# Altium PCB IOT_Speaker.PcbDoc (part 4 of 4)
Units mm, origin at the board's own origin, x right, y up, seen from the top; angles counter-clockwise.
Board outline 89.7 x 68.14 mm, 2 copper layers (Top Layer, Bottom Layer), stack 1.448 mm thick; 210 components, 131 nets, 623 pads, 336 vias.
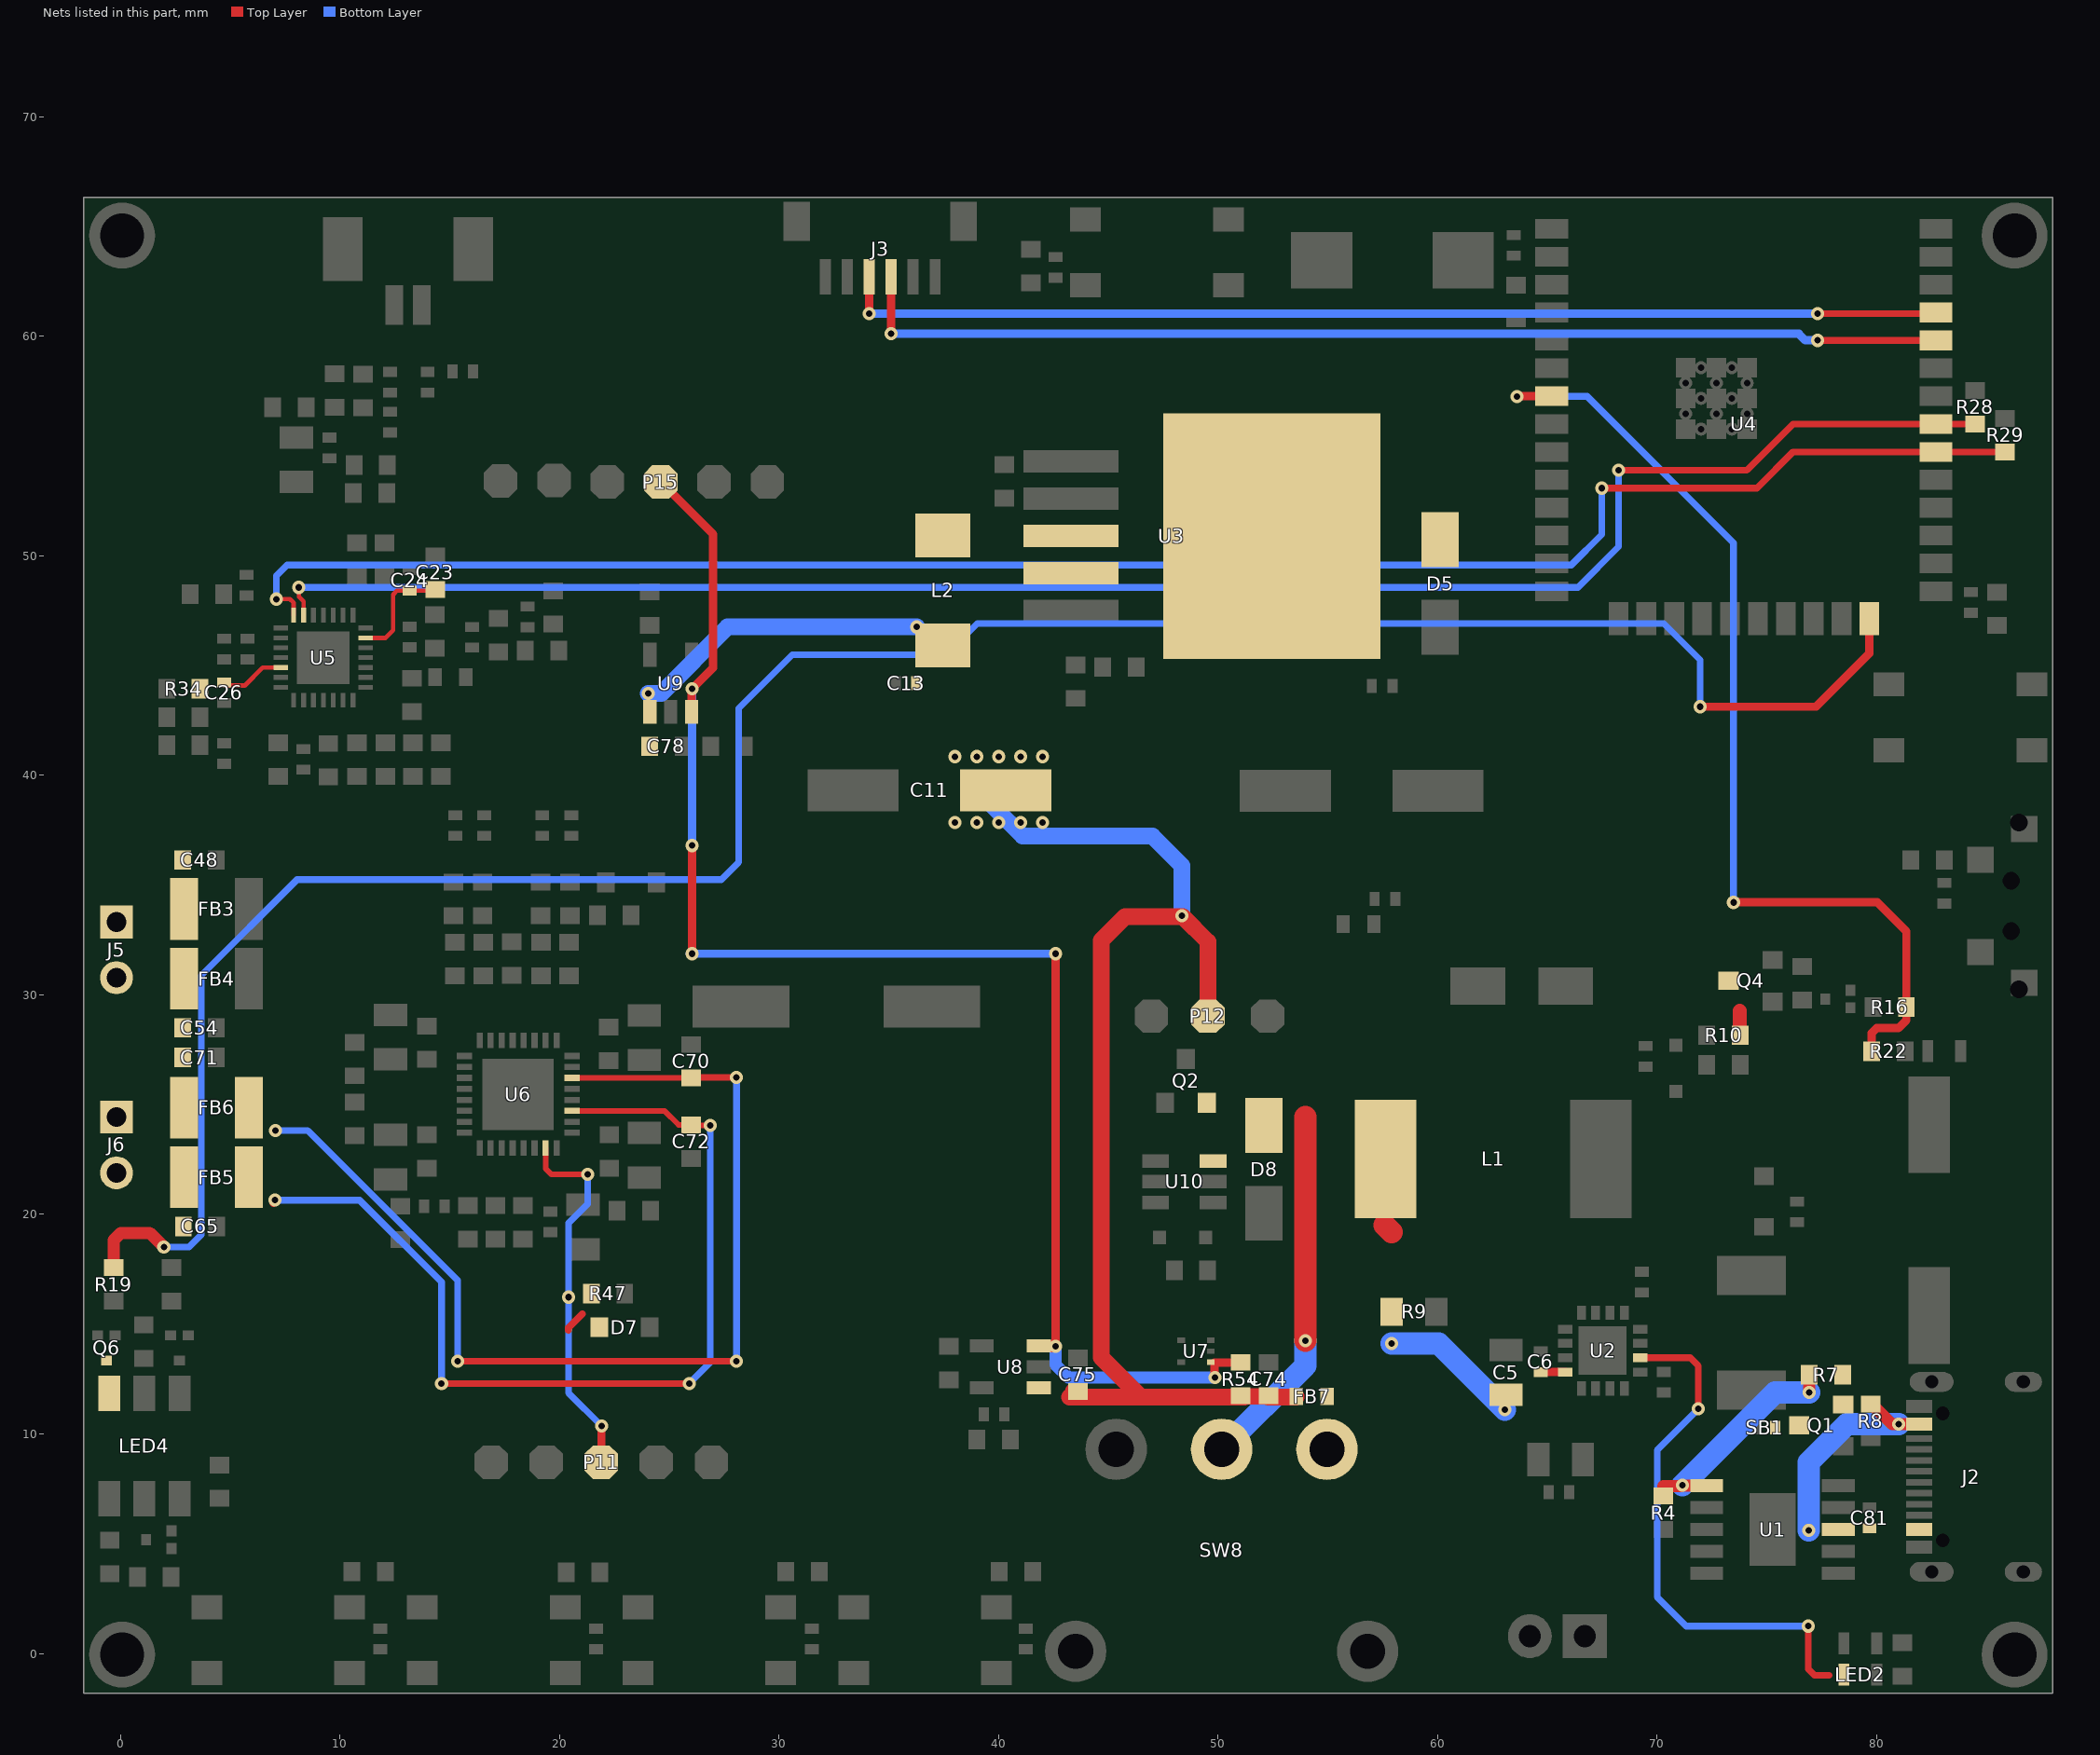
[diagram p3: the nets of this part, all layers, seen from the top]

## Via types
v1: diameter 0.6, hole 0.3, Top Layer to Bottom Layer, 183 vias
v2: diameter 0.6, hole 0.3, Top Layer to Bottom Layer, tented both sides, 153 vias

## Nets (pads, with @x,y where several pads share a name; then routed paths per layer and width w, separated by ;. In a path a pad name is that pad's centre, name@x,y a point inside that pad or via, vN(x,y) a via of type N, cw(c..) or ccw(c..) an arc to the next point about the centre after c; other vN are vias at no path point) (continued)
PWR_EN: P15.1 R54.1 U7.1 U8.3 U9.3 | length 70.2
  Top Layer w0.381: P15.1@24.498,53.48 27,50.978 27,44.907 v2(26.035,43.942) 26.027,43.934 26.027,42.904 U9.3@26.02,42.896 ; v2@25.976,31.877 v2@26.035,31.936 ; v2(26.035,31.877) v2@26.035,31.936 ; v2(26.035,36.805) v2@26.035,31.936 ; U8.3@41.838,14.006 41.844,14.001 42.091,14.001 42.591,14.001 v2(42.596,13.995) ; v2@42.596,14.192 v2(42.596,31.877) ; v2(49.86,12.573) 49.849,12.584 49.849,13.241 51.198,13.241 R54.1@51.206,13.233
  Top Layer w0.559: U8.3@42.071,14.021 42.091,14.001 42.096,13.995 v2(42.596,13.995)
  Bottom Layer w0.381: v2@25.933,31.877 v2(26.035,31.877) v2(42.596,31.877) ; v2(26.035,36.805) v2(26.035,43.942)
  Bottom Layer w0.559: v2(42.596,13.995) 42.596,13.157 43.18,12.573 v2(49.86,12.573)
R_EN: R19.2 U4.24 | length 109.8
  Top Layer w0.381: v2(71.958,43.129) 77.241,43.129 79.672,45.56 U4.24@79.672,47.137
  Top Layer w0.559: R19.2@-0.305,17.577 -0.305,18.824 0.023,19.152 1.335,19.152 1.97,18.517 v2(1.981,18.517)
  Bottom Layer w0.305: v2(1.981,18.517) 3.124,18.517 3.683,19.075 3.683,30.886 8.052,35.255 27.381,35.255 28.169,36.043 28.169,43.053 30.607,45.491 37.617,45.491 39.039,46.914 70.307,46.914 71.958,45.263 v2(71.958,43.129)
RED: LED4.6 Q6.3 | length 0.2
  Top Layer w0.635: LED4.6@-0.635,11.976 LED4.6@-0.508,11.849
ROUTN: C70.1 FB6.1 U6.30 | length 48
  Top Layer w0.254: U6.30@20.569,26.219 20.572,26.216 26.01,26.216 C70.1@26.032,26.238
  Top Layer w0.305: v2(15.367,13.31) v2(28.067,13.31) ; C70.1@26.032,26.238 v2(28.067,26.238)
  Bottom Layer w0.305: v2(7.061,23.825) 8.534,23.825 15.367,16.993 v2(15.367,13.31) ; v2(28.067,13.31) v2(28.067,26.238)
ROUTP: C72.1 FB5.1 U6.27 | length 44
  Top Layer w0.254: U6.27@20.569,24.719 24.786,24.719 25.425,24.079 C72.1@25.753,24.079 ; C72.1@25.692,24.172 25.753,24.111 C72.1@25.753,24.079 ; v2(26.873,24.054) 26.035,24.054 C72.1@26.01,24.079 C72.1@25.753,24.079
  Top Layer w0.305: v2(14.63,12.294) v2(25.908,12.294)
  Top Layer w0.381: v2@6.985,20.523 6.985,20.599 v2(7.036,20.65)
  Bottom Layer w0.305: v2(7.036,20.65) 10.897,20.65 14.63,16.916 v2(14.63,12.294) ; v2(25.908,12.294) 26.873,13.259 v2(26.873,24.054)
RXD: J3.4 U4.34 | length 50.3
  Top Layer w0.305: v2(77.318,59.817) U4.34@82.702,59.817
  Top Layer w0.381: v2(35.103,60.122) 35.106,60.125 35.106,62.709 J3.4@35.109,62.713
  Bottom Layer w0.381: v2(35.103,60.122) 76.454,60.122 76.759,59.817 v2(77.318,59.817)
S\D\: D7.1 P11.1 R47.2 U6.23 | length 18.1
  Top Layer w0.254: U6.23@19.369,23.019 19.369,22.084 19.634,21.819 v2(21.285,21.819)
  Top Layer w0.305: 20.422,14.707 20.405,14.724 20.405,14.829 21.044,15.469
  Top Layer w0.381: P11.1@21.907,8.712 21.914,8.719 21.914,10.357 v2(21.92,10.363)
  Bottom Layer w0.305: v2(21.285,21.819) 21.285,20.472 20.422,19.609 v2(20.422,16.231) 20.422,11.862 v2(21.92,10.363)
SCL: R29.1 U4.30 U5.28 | length 84.8
  Top Layer w0.203: v2(7.112,48.031) 7.722,48.031 7.896,47.857 U5.28@7.896,47.297
  Top Layer w0.305: v2(67.488,53.086) 74.549,53.086 76.2,54.737 U4.30@82.702,54.737 R29.1@85.852,54.737
  Bottom Layer w0.305: v2(7.112,48.031) 7.112,49.1 7.593,49.581 66.091,49.581 67.488,50.978 v2(67.488,53.086)
SDA: R28.1 U4.31 U5.27 | length 82.8
  Top Layer w0.203: v2@8.136,48.556 8.136,48.13 8.346,47.921 U5.27@8.346,47.297
  Top Layer w0.305: v2(68.25,53.899) 74.092,53.899 76.2,56.007 U4.31@82.702,56.007 R28.1@84.48,56.007
  Bottom Layer w0.305: v2(8.128,48.565) 66.396,48.565 68.25,50.419 v2(68.25,53.899)
SLK: C26.1 R34.1 U5.5 | length 2.9
  Top Layer w0.203: C26.1@4.724,44.094 5.664,44.094 6.484,44.914 U5.5@7.313,44.914
SPKL_N: C48.2 FB3.2 J5.1
SPKL_P: C54.2 FB4.2 J5.2
SPKR_N: C71.2 FB6.2 J6.1
SPKR_P: C65.2 FB5.2 J6.2
STDBY: LED2.2 U2.14 | length 24.6
  Top Layer w0.305: U2.14@69.239,13.471 71.517,13.471 71.882,13.106 v2(71.882,11.141) ; v2(76.886,1.245) 76.886,-0.711 77.165,-0.991 77.835,-0.991 ; LED2.2@78.473,-0.991 LED2.2@78.508,-0.956
  Bottom Layer w0.305: v2(71.882,11.141) 70.002,9.261 70.002,2.565 71.323,1.245 v2(76.886,1.245)
SW_BOOST: D5.2 L2.2 U3.3 U3.6
TXD: J3.3 U4.35 | length 50.3
  Top Layer w0.305: v2(77.318,61.041) U4.35@82.656,61.041
  Top Layer w0.381: J3.3@34.109,62.713 34.109,61.09 34.112,61.087 v2(34.112,61.041) ; U4.35@82.656,61.041 U4.35@82.702,61.087
  Bottom Layer w0.381: v2(34.112,61.041) v2(77.318,61.041)
V_MON: Q4.3 R10.2 | length 1.2
  Top Layer w0.508: Q4.3@73.26,30.643 Q4.3@73.31,30.593
  Top Layer w0.635: R10.2@73.767,28.163 73.767,29.269
V_SYS: D8.1 Q2.2 SW8.2 U10.6 | length 16.7
  Top Layer w1.016: v1(53.975,14.249) 53.975,24.435
  Bottom Layer w1.016: SW8.2@50.165,9.299 53.975,13.109 v1(53.975,14.249)
V_SYS#: FB7.2 SW8.1 | length 0
V_SYS##: C11.1 C13.1 C74.1 C75.1 C78.1 FB7.1 L2.1 P12.1 R54.2 U3.4 U8.1 U9.1 | length 67.4
  Top Layer w0.762: C75.1@43.231,11.684 46.482,11.684 ; C75.1@43.409,11.938 43.472,11.938 C75.1@43.701,11.709 ; P12.1@49.536,29.032 49.536,32.429 48.4,33.566 45.758,33.566 44.679,32.487 44.679,13.487 46.482,11.684 ; R54.2@51.206,11.684 46.482,11.684 ; R54.2@51.206,11.709 C74.1@52.476,11.709 ; C74.1@52.273,11.684 53.566,11.684 FB7.1@53.566,11.709
  Bottom Layer w0.762: v1(24.054,43.739) 24.638,43.739 27.661,46.761 v1(36.271,46.761) ; 39.611,38.735 40.251,38.095 40.751,37.595 41.103,37.243 47.009,37.243 48.362,35.89 v1(48.362,33.604)
  other v1: 38.012,37.855 39.012,37.855 40.012,37.855 41.012,37.855 42.012,37.855 38.012,40.855 39.012,40.855 40.012,40.855 41.012,40.855 42.012,40.855
VBUS: C81.1 J2.A4/B9 J2.B4/A9 Q1.2 R7.2 R8.2 U1.8 | length 10.5
  Top Layer w0.559: v1(76.911,5.613) v1@76.915,5.617 ; R8.2@79.731,11.354 79.794,11.354 80.702,10.446 v1(81.001,10.446) J2.B4/A9@81.937,10.446
  Bottom Layer w1.016: v1(76.911,5.613) 76.911,8.712 78.645,10.446 v1(81.001,10.446)
VDD_CH: R4.2 R7.1 U1.1 | length 10.3
  Top Layer w0.559: 70.282,7.62 71.101,7.62 71.141,7.66 71.163,7.66 71.183,7.641 72.231,7.641 U1.1@72.235,7.638 ; v1@76.933,11.891 R7.1@76.933,12.686
  Bottom Layer w1.016: v1(71.152,7.66) 75.379,11.887 v1(76.937,11.887)
VMID: C23.1 C24.1 U5.20 | length 5
  Top Layer w0.203: U5.20@11.179,46.264 12.076,46.264 12.421,46.609 12.421,48.235 12.598,48.412 14.275,48.412 C23.1@14.338,48.476
VOUT_CH: Q1.3 SB1.1
VS: C5.1 C6.1 L1.2 R9.1 U2.8 | length 8.5
  Top Layer w0.381: C6.1@64.599,12.821 U2.8@65.822,12.821
  Top Layer w0.635: L1.2@57.637,22.53 L1.2@57.912,22.255
  Top Layer w1.016: 57.594,19.507 57.912,19.19
  Bottom Layer w1.016: v1(57.912,14.122) 60.057,14.122 v1(63.073,11.106)
WIFI_BAT_STAT: R16.2 R22.2 U4.7 | length 45.9
  Top Layer w0.381: v2@63.628,57.277 U4.7@65.202,57.277 ; v2(73.482,34.214) 80.035,34.214 81.356,32.893 R16.2@81.356,29.439 ; R22.2@79.781,27.432 79.781,28.262 80.005,28.485 80.992,28.485 81.356,28.849 R16.2@81.356,29.439 ; R16.2@81.215,29.297 R16.2@81.356,29.439
  Bottom Layer w0.305: v2(63.615,57.264) 66.815,57.264 73.482,50.597 v2(73.482,34.214)
pads on no net: J2.A8 J2.B8 J2.MH SW3.3 SW3.4 SW3.MH SW8.3 U2.6 U4.5 U4.17 U4.18 U4.19 U4.20 U4.21 U4.22 U4.27 U4.29 U4.32 U5.9 U5.25 U6.1 U6.8 U6.17 U6.24 U7.3 U9.4

## Polygon pours and split planes (outlines as drawn)
GND on Top Layer "sc" (solid, remove dead copper, pour order 0): 28.331,63.581 28.331,40.198 26.452,38.318 1.077,38.318 1.077,0.523 85.7,0.523 85.7,63.581
AGND on Top Layer "AGND_L01_P004" (solid, remove dead copper, pour order 4): 27.256,63.795 27.303,40.865 25.796,39.472 0.864,39.472 0.864,63.795
GND on Bottom Layer "GND_L02_P003" (solid, remove dead copper, pour order 3): 27.889,63.795 85.486,63.795 85.486,0.737 0.864,0.737 0.864,38.557 25.679,38.557 27.889,40.767 27.889,51.429
AGND on Bottom Layer "AGND_L02_P007" (solid, remove dead copper, pour order 7): 27.407,63.795 26.976,40.816 25.657,39.497 0.864,39.497 0.864,63.795

## Other copper
Top Layer:
  rectangle net GND: 2.013,14.199 2.572,14.656
  rectangle net NetQ7_1: 2.781,14.224 3.467,16.434
  rectangle net NetQ7_1: 1.88,15.672 3.467,16.434
  rectangle net NetQ6_1: -1.041,15.672 0.14,16.434
  rectangle net NetQ6_1: -0.546,14.224 0.14,16.434
  rectangle net GND: -1.473,14.224 -0.787,15.469
  rectangle net GND: 2.007,5.309 2.54,5.867
  rectangle net NetQ8_1: 1.93,3.023 2.718,5.029
  rectangle net GND: 78.537,29.921 79.096,30.226
  rectangle net NetQ4_1: 74.803,29.261 77.902,30.251
  rectangle net NetQ5_1: 79.375,29.439 80.239,30.15
  rectangle net NetQ5_1: 78.461,28.931 80.239,29.762
  rectangle net GND: 69.088,25.273 77.724,25.933
  rectangle net 12V: 51.13,14.961 53.01,21.336
  region net LX: 68.846,18.339 68.846,31.801 66.015,31.801 66.015,18.339
  rectangle net VBUS: 76.479,5.131 80.924,6.121
  rectangle net V_MON: 73.05,27.629 74.238,31.039
  region net BOOST_12V: 25.273,19.685 25.273,20.625 23.774,20.625 23.774,19.685
  rectangle net VS: 56.21,13.462 58.979,25.349
  rectangle net GND: 30.201,64.084 56.159,66.142
  rectangle net AGND: 24.765,40.018 26.06,41.109
  rectangle net GND: 71.476,6.274 80.137,6.96
  rectangle net GND: 34.747,26.924 41.021,34.163
  rectangle net BATT: 64.16,10.262 66.751,11.176
  rectangle net BATT: 65.964,10.592 66.751,12.395
  rectangle net NetC55_1: 19.99,34.722 20.98,37.49
  rectangle net NetC56_1: 18.644,34.722 19.634,37.49
  rectangle net NetC57_1: 16.002,34.722 16.993,37.49
  rectangle net GND: 52.857,62.027 56.159,63.652
  rectangle net NetC58_1: 14.681,34.722 15.672,37.49
  rectangle net BOOST_12V: 24.943,28.448 28.448,30.759
  rectangle net BSRP: 25.527,21.311 26.467,22.936
  rectangle net BOOST_12V: 21.615,23.038 24.74,24.219
  rectangle net BOOST_12V: 24.282,23.038 25.248,23.825
  rectangle net BOOST_12V: 21.793,26.528 25.298,27.595
  rectangle net ROUTN: 5.194,23.416 7.468,26.311
  rectangle net ROUTP: 5.194,20.241 7.468,23.136
  rectangle net LOUTN: 5.182,32.461 7.188,35.331
  rectangle net LOUTP: 5.194,29.286 7.201,32.182
  rectangle net GND: 3.912,18.136 11.049,19.914
  rectangle net GND: 3.683,26.568 5.461,29.058
  rectangle net SPKR_P: 2.413,18.872 3.683,20.625
  rectangle net SPKR_P: -1.041,20.091 3.683,23.089
  rectangle net SPKR_N: -1.041,23.317 3.531,27.661
  rectangle net SPKL_P: -1.041,27.864 3.531,32.207
  rectangle net SPKL_N: -1.041,32.487 3.531,36.83
  rectangle net BOOST_12V: 27.711,26.848 34.239,35.382
  rectangle net GND: 82.829,25.095 85.347,34.468
  rectangle net CODEC_3V3#: 15.596,45.085 18.999,46.177
  rectangle net CODEC_3V3: 18.212,46.406 19.964,47.269
  rectangle net GND: 28.016,36.195 35.585,44.704
  rectangle net MUTE: 21.26,29.972 22.53,35.636
  rectangle net BATT: 59.233,9.195 61.925,16.281
  rectangle net 12V#: 72.72,11.1 76.022,14.326
  rectangle net DACVREF: 12.802,45.441 14.783,46.203
  rectangle net 3.3V: 84.912,45.974 85.954,47.32
  rectangle net GND: 73.076,25.629 77.724,27.33
  rectangle net GND: 69.088,25.273 70.129,27.178
  rectangle net BAT_ADC: 69.063,27.432 70.841,28.753
  rectangle net BAT_ADC: 70.46,26.111 72.771,28.753
  rectangle net GND: 22.733,28.931 23.673,34.239
  rectangle net AGND: 15.824,57.912 16.967,65.583
  rectangle net V_SYS##: 41.148,11.303 44.145,12.497
  rectangle net GND: 40.03,5.588 40.919,13.437
  rectangle net 3.3V: 40.608,3.283 41.624,4.172
  rectangle net GND: 68.682,17.132 69.621,17.907
  rectangle net VBUS: 76.556,5.334 82.525,5.944
  rectangle net PWR_EN: 41.199,13.665 42.926,14.376
  rectangle net GND: 71.476,6.299 72.746,6.934
  rectangle net VDD_CH: 69.774,7.264 73.076,8.306
  rectangle net GND: 85.776,3.265 87.554,12.827
  rectangle net GND: 81.204,3.265 87.274,4.408
  rectangle net GND: 81.204,11.684 87.274,12.827
  rectangle net BATT: 47.904,26.137 49.759,27.788
  rectangle net BATT: 45.237,26.137 48.019,30.404
  rectangle net 12V: 72.441,16.637 87.529,19.888
  rectangle net BATT: 45.466,22.022 47.828,22.835
  rectangle net CHRG_CHK: 48.209,20.142 50.648,20.93
  rectangle net V_SYS#: 53.365,7.849 56.693,10.77
  rectangle net V_SYS#: 54.534,7.849 56.693,12.141
  rectangle net BATT: 47.955,26.619 49.047,27.559
  rectangle net 3.3V: 47.498,17.145 48.514,17.983
  rectangle net CHRG_CHK: 49.124,16.967 50.648,20.93
  rectangle net GND: 46.482,18.567 47.828,21.869
  rectangle net V_SYS: 48.997,22.022 54.483,25.603
  rectangle net NetLED3_1: 80.924,26.797 82.626,28.042
  rectangle net SW_BOOST: 56.998,49.428 61.138,56.49
  region net GND: 33.604,64.414 32.712,64.414 32.712,61.874 33.604,61.874
  rectangle net GND: 81.204,3.265 82.499,5.17
  rectangle net GND: 81.204,10.922 82.499,12.827
  rectangle net PG: 77.445,7.239 79.045,10.236
  rectangle net AGND: 9.169,62.509 16.967,65.583
  rectangle net MIC_N: 13.614,57.912 15.469,58.725
  rectangle net MIC_P: 9.296,57.887 12.7,58.649
  rectangle net NetC43_2: 13.614,52.349 14.376,57.709
  rectangle net 3.3V: 80.937,35.7 82.004,37.922
  rectangle net GND: 82.753,33.909 83.414,34.468
  rectangle net RED: -1.067,11.049 0.076,13.691
  region net 3.3V: 5.011,9.03 3.995,9.03 3.995,8.141 5.011,8.141
  region net 3.3V: -0.038,3.143 -0.038,4.159 -0.927,4.159 -0.927,3.143
  rectangle net 3.3V: 31.347,3.283 32.363,4.172
  rectangle net 3.3V: 21.351,3.258 22.367,4.147
  rectangle net 3.3V: 11.582,3.283 12.598,4.172
  rectangle net BOOST_12V: 11.557,23.089 15.113,24.13
  rectangle net BOOST_12V: 11.532,26.543 14.402,27.762
  rectangle net PWR_EN: 49.454,13.081 50.013,13.437
  rectangle net V_SYS##: 50.597,11.151 53.95,12.217
  rectangle net GND: 48.133,14.046 48.793,14.427
  rectangle net BATT: 46.825,12.624 48.997,13.64
  rectangle net 3.3V: 62.89,60.35 64.186,61.239
  rectangle net 3.3V: 85.344,55.753 86.385,57.252
  rectangle net 3.3V: 84.023,56.972 86.385,59.131
  rectangle net SLK: 3.251,43.459 4.14,44.59
  rectangle net MCLK: 4.267,47.701 6.071,48.717
  rectangle net AGND: 4.343,44.983 6.147,45.517
  rectangle net SLK: 3.251,43.815 5.156,44.59
  rectangle net LCK: 3.251,40.919 5.156,41.961
  rectangle net AGND: 7.976,39.421 9.982,40.513
  rectangle net 3.3V: 15.291,44.031 16.18,44.92
  rectangle net AGND: 12.776,46.431 17.856,47.777
  rectangle net AGND: 13.487,49.047 25.451,50.47
  rectangle net AGND: 12.852,49.047 14.249,50.241
  rectangle net 3.3V: 6.261,56.286 7.391,57.429
  rectangle net AGND: 10.516,53.95 11.557,57.15
  rectangle net NetC37_2: 7.188,54.889 10.262,56.032
  rectangle net NetC37_2: 7.95,55.093 10.262,57.252
  rectangle net AGND: 7.163,52.349 11.557,54.686
  rectangle net NetC43_2: 11.735,52.349 14.376,55.905
  rectangle net GND: 10.998,17.882 11.963,21.209
  rectangle net GND: 10.998,21.031 15.519,22.885
  rectangle net GND: 15.265,22.276 16.027,23.876
  rectangle net GND: 17.272,31.928 18.288,33.223
  rectangle net GND: 22.428,15.9 23.444,17.196
  rectangle net GND: 11.049,17.882 21.996,19.507
  rectangle net GND: 11.444,28.194 14.427,36.805
  rectangle net NetC33_2: 8.001,40.945 9.957,41.859
  rectangle net 3.3V##: 4.343,46.355 6.248,46.634
  rectangle net 3.3V##: 4.343,45.695 7.671,46.406
  rectangle net 3.3V##: 12.686,44.044 14.757,44.907
  rectangle net AGND: 24.765,40.843 25.451,48.87
  region net BOOST12V_EN: 45.466,52.07 45.466,53.113 39.802,53.113 39.802,52.07
  region net AGND: 25.451,50.47 15.265,50.47 15.265,47.422 25.451,47.422
  region net CODEC_3V3: 24.613,47.269 19.583,47.269 19.583,44.882 24.613,44.882
  rectangle net V_SYS##: 23.622,40.843 24.501,44.145
  rectangle net AGND: 24.765,40.865 27.303,41.91
  rectangle net GND: 37.211,11.76 38.252,13.106
  rectangle net NetC58_2: 14.732,31.979 15.723,34.011
  rectangle net NetC57_2: 16.027,31.979 17.018,34.011
  rectangle net NetC56_2: 18.669,31.979 19.66,34.011
  rectangle net NetC55_2: 19.939,31.979 20.93,34.011
  rectangle net GND: 21.387,27.874 24.638,29.591
  rectangle net AVCC: 22.25,19.609 23.012,20.93
  rectangle net AVCC: 19.025,19.837 23.012,20.955
  region net NetR53_2: 14.072,20.777 12.294,20.777 12.294,19.964 14.072,19.964
  rectangle net PL: 14.529,19.964 16.281,20.777
  rectangle net S\D\: 19.863,14.072 22.225,16.866
  rectangle net GND: 21.793,21.107 24.638,22.682
  rectangle net BOOST_12V: 55.194,32.69 56.21,33.68
  rectangle net V_SYS##: 39.345,36.119 42.799,43.891
  region net GND: 45.466,53.467 45.466,55.067 32.715,55.067 32.715,53.467
  rectangle net 3.3V: 31.623,60.579 32.537,63.551
  rectangle net GND: 83.468,25.883 84.738,28.159
  rectangle net GND: 77.318,20.32 87.655,26.314
  rectangle net STDBY: 77.521,-1.499 78.791,-0.406
  rectangle net CHRG: 77.521,-0.076 78.791,1.016
  region net BATT: 65.354,7.737 65.354,11.1 64.16,11.1 64.16,7.737
  rectangle net VS: 62.128,10.516 63.906,12.37
  rectangle net GND: 70.841,55.321 74.574,64.948
  rectangle net GND: 56.045,65.082 65.964,66.149
  rectangle net GND: 63.144,64.364 83.464,66.142
  rectangle net BATT: 74.803,30.759 77.089,32.664
  region net GND: 44.018,12.675 44.018,13.437 37.211,13.437 37.211,12.675
  rectangle net GND: 43.078,12.675 44.12,13.843
  rectangle net GND: 73.965,20.32 83.49,22.682
  region net 12V: 66.777,15.189 66.777,15.926 65.456,15.926 65.456,15.189
  rectangle net 12V: 65.456,14.554 66.192,15.926
  region net GND: 66.269,-1.457 66.269,-0.635 57.929,-0.635 57.929,-1.457
  rectangle net 3.3V: 38.557,8.153 39.802,12.421
  rectangle net GND: 41.021,63.271 56.159,65.354
  rectangle net EN: 36.855,61.747 51.968,62.916
  rectangle net GND: 62.128,13.268 65.136,14.427
  rectangle net VS: 62.128,11.43 65.1,13.056
  rectangle net GND: 65.619,-1.473 67.981,2.032
  rectangle net GND: 65.71,-1.473 68.021,10.033
  rectangle net BATT: 62.992,-0.381 65.278,2.007
  rectangle net BATT: 59.233,-0.381 65.354,10.135
  rectangle net GND: 67.615,11.481 70.685,12.395
  rectangle net GND: 42.062,-0.965 58.318,1.702
  rectangle net BLUE: 0.584,4.547 1.753,7.849
  rectangle net BUTTON_4: 39.116,0.889 41.758,2.718
  rectangle net BUTTON_3: 29.362,0.889 32.004,2.718
  rectangle net BUTTON_2: 19.533,0.889 22.174,2.718
  rectangle net BUTTON_1: 9.703,0.889 12.344,2.718
  rectangle net GND: 2.743,-1.473 58.318,0.483
  rectangle net VDD_CH: 69.774,6.706 70.739,8.306
  rectangle net 12V#: 72.72,9.906 74.676,13.741
  rectangle net VOUT_CH: 75.108,9.881 76.962,10.871
  rectangle net PG: 77.445,8.832 80.239,10.236
  rectangle net VBUS: 77.953,10.592 80.289,13.208
  rectangle net 12V: 80.645,13.183 87.528,15.138
  rectangle net 12V: 68.859,14.58 87.528,15.316
  rectangle net 12V: 68.275,15.164 87.528,16.967
  rectangle net LX: 64.135,29.046 68.072,31.825
  rectangle net LX: 66.98,15.189 68.072,20.345
  rectangle net NetFB1_2: 56.628,32.766 57.404,34.696
  rectangle net GND: 50.978,36.347 57.302,44.882
  rectangle net BOOST_12V#: 57.582,33.96 62.332,48.412
  rectangle net FB_BOOST12V: 40.919,44.399 45.491,48.108
  pour cut-out: 2.057,29.185 6.68,29.185 6.68,32.283 2.057,32.283
  pour cut-out: 2.057,32.36 6.68,32.36 6.68,35.458 2.057,35.458
  pour cut-out: 34.823,51.994 34.823,44.831 40.183,44.831 40.183,51.994
  pour cut-out: 56.159,28.55 56.159,16.459 56.159,16.358 68.885,16.358 68.91,16.383 68.91,28.575 68.91,28.55 68.732,28.55 56.159,28.651
  region net SW_BOOST: 35.966,51.994 39.345,51.994 39.827,51.511 49.047,51.511 49.047,50.292 39.853,50.292 39.421,49.86 35.966,49.86
  region net V_SYS##: 40.747,49.378 41.077,49.708 45.573,49.708 45.573,48.412 40.183,48.412 40.096,48.325 40.096,36.017 35.972,36.017 35.972,49.378
Bottom Layer:
  rectangle net BOOST_12V#: 57.582,35.154 62.255,42.545
  rectangle net V_SYS##: 36.424,36.119 42.774,42.418
  region net GND: 41.275,31.267 34.379,31.267 34.379,26.975 41.275,26.975
  rectangle net GND: 76.654,20.345 87.605,27.102
  rectangle net 12V: 76.683,13.183 87.528,19.939
  rectangle net BOOST_12V: 27.432,26.848 34.15,31.369
  rectangle net GND: 16.662,24.333 19.38,26.645
  rectangle net BATT: 61.112,-0.33 65.354,8.56
  rectangle net 12V#: 72.695,13.208 75.997,14.3
  rectangle net GND: 74.193,4.75 76.251,7.315
  rectangle net GND: 70.79,54.94 74.803,58.826
  rectangle net 3.3V: 31.674,61.163 32.588,64.11
  rectangle net 12V: 65.312,15.037 69.342,16.053
  rectangle net GND: 81.483,11.85 87.554,12.993
  rectangle net GND: 81.483,3.2 87.554,4.343
  rectangle net GND: 86.36,3.2 87.554,12.993
  rectangle net AGND: 7.696,45.136 11.201,46.66
  rectangle net AGND: 5.207,39.827 11.201,45.288
  rectangle net GND: 66.472,12.675 68.605,14.884
  region net GND: 69.367,20.371 83.201,34.204 83.201,20.371

## Silkscreen, mask and mechanical layers (free items; w line width, h text height)
Top Overlay:
  lines w0.254: -0.457,2.667 -0.457,2.972 ; -0.152,18.263 -0.152,18.567 ; 14.986,47.701 15.291,48.006 ; 15.254,38.583 15.254,39.257 15.519,39.522 15.697,39.7 16.154,39.7 ; 16.459,29.997 16.459,30.302 ; 19.177,29.997 19.177,30.302 ; 19.888,17.043 20.599,17.043 20.726,17.17 20.726,17.704
  text "Microphone" at 17.018,64.643 h1.52
  text "*" at 63.157,64.423 h2.03
  text "#" at 41.796,60.958 h1.27
  text "*" at 42.278,60.867 h2.03
  text "Programming" at 30.31,60.3 h1.52
  text "RESET" at 43.472,60.3 h1.52
  text "*" at 12.611,60.19 h2.03 r180
  text "@" at 63.094,59.477 h1.14
  text "@" at 39.776,54.982 h1.14
  text "*" at 12.865,54.695 h2.03
  text "BST_12V_EN" at 30.172,54.395 h1.52 r90
  text "PWR_EN" at 25.311,54.335 h1.52 r90
  text "CODEC_3V3" at 22.882,54.302 h1.52 r90
  text "BST_12V#" at 27.784,54.306 h1.52 r90
  text "*" at 9.207,52.663 h2.03
  text "#" at 11.062,52.047 h1.27 r180
  text "#" at 12.383,52.047 h1.27 r180
  text "*" at 13.5,51.096 h2.03 r180
  text "#" at 24.422,49.812 h1.27 r180
  text "*" at 18.86,49.496 h2.03 r180
  text "@" at 85.014,49.114 h1.14
  text "*" at 13.5,48.556 h2.03 r180
  text "*" at 16.345,48.556 h2.03 r180
  text "*" at 5.042,48.074 h2.03 r180
  text "*" at 6.109,48.074 h2.03 r180
  text "BOOT" at 79.832,44.958 h1.52
  text "*" at 36.026,44.513 h2.03 r270
  text "*" at 57.192,43.752 h2.03 r90
  text "#" at 22.705,41.643 h1.27 r270
  text "*" at 8.014,38.464 h2.03
  text "ERASE_BUT" at 79.274,38.405 h1.52
  text "#" at 15.496,36.589 h1.27 r180
  text "#" at 16.816,36.589 h1.27 r180
  text "#" at 19.458,36.589 h1.27 r180
  text "#" at 20.804,36.589 h1.27 r180
  text "@" at 79.985,35.881 h1.14
  text "LEFT" at -1.649,35.408 h0.76
  text "SPEAKER" at -1.649,34.671 h0.76
  text "#" at 18.137,33.871 h1.27 r180
  text "@" at 23.8,33.366 h1.14
  text "*" at 82.766,32.368 h2.03
  text "-VE" at 1.976,32.207 h1.02 r90
  text "~" at 77.585,31.151 h0.89 r180
  text "BATT" at 47.704,30.066 h1.52 r90
  text "V_SYS##" at 50.276,30.066 h1.52 r90
  text "12V" at 53.01,30.066 h1.52 r90
  text "#" at 14.276,30.035 h1.27 r180
  text "#" at 21.933,29.985 h1.27 r180
  text "+VE" at 1.976,29.693 h1.02 r90
  text "*" at 68.461,28.816 h2.03 r270
  text "#" at 10.96,28.471 h1.27
  text "WIFI" at 84.866,26.797 h1.52
  text "RIGHT" at -1.599,26.518 h0.76
  text "SPEAKER" at -1.599,25.781 h0.76
  text "#" at 25.651,25.641 h1.27 r270
  text "#" at 21.882,25.148 h1.27 r180
  text "-VE" at 1.976,23.444 h1.02 r90
  text "#" at 27.343,22.888 h1.27 r180
  text "#" at 10.96,22.146 h1.27
  text "#" at 16.76,21.846 h1.27 r180
  text "#" at 18.013,21.846 h1.27 r180
  text "#" at 15.278,21.715 h1.27
  text "+VE" at 1.976,20.853 h1.02 r90
  text "*" at 76.06,20.392 h2.03
  text "*" at 19.901,19.385 h2.03 r180
  text "#" at 15.557,18.189 h1.27 r180
  text "*" at 68.999,17.191 h2.03
  text "@" at 23.597,16.12 h1.14
  text "~" at -1.384,14.9 h0.89
  text "#" at 43.218,14.912 h1.27 r180
  text "~" at 1.969,14.883 h0.89
  text "@" at 50.521,14.138 h1.14
  text "*" at 64.351,13.559 h2.03
  text "*" at 69.987,12.63 h2.03
  text "*" at 40.064,11.214 h2.03 r270
  text "MUTE" at 20.13,9.735 h1.52 r90
  text "3V3" at 27.597,9.707 h1.52 r90
  text "PL" at 17.641,9.693 h1.52 r90
  text "SD" at 22.594,9.693 h1.52 r90
  text "GND" at 25.134,9.693 h1.52 r90
  text "@" at 79.249,8.506 h1.14
  text "@" at 69.818,7.947 h1.14
  text "*" at 65.807,7.658 h2.03 r270
  text "*" at 79.362,6.435 h2.03
  text "~" at 2.68,5.903 h0.89 r180
  text "BATTERY" at 61.658,5.072 h1.78
  text "@" at 39.642,4.594 h1.14
  text "+VE" at 61.658,4.196 h1.02
  text "-VE" at 65.735,4.196 h1.02
  text "@" at 12.675,3.47 h1.14
  text "@" at 32.44,3.47 h1.14
  text "@" at 22.443,3.445 h1.14
  text "Button 1" at 4.489,3.023 h1.4
  text "Button 2" at 14.243,3.023 h1.4
  text "Button 3" at 24.225,3.023 h1.4
  text "Button 4" at 33.953,3.023 h1.4
  text "USB" at 81.264,1.823 h1.78
  text "LV Detection" at 43.594,1.682 h1.52 r90
  text "CHARGING" at 69.948,-0.178 h1.52
  text "*" at 11.519,-1.605 h2.03
  text "*" at 21.349,-1.605 h2.03
  text "*" at 31.178,-1.605 h2.03
  text "*" at 40.932,-1.605 h2.03
  text "STANDBY" at 69.948,-1.6 h1.52
Bottom Overlay:
  drawing of 3068 lines, arcs and shapes, not listed
  text "NOTE:" at 7.315,61.701 h1.27
  text "*>> 0.1uF 0402" at 7.315,60.104 h1.27
  text "#>> 1uF 0603" at 7.315,58.506 h1.27
  text "@ >> 10K 0603" at 7.315,56.896 h1.27
  text "~ >> Q5 - Q8" at 7.315,55.278 h1.27
  text "ZERO CARBON FOOTPRINT" at 50.825,26.264 h0.97
Board Outline:
  the board outline again, w0.254
Fabrication:
  drawing of 328 lines, arcs and shapes, not listed
  text "Layer" at 97.987,64.217 h1.52
  text "Name" at 108.398,64.217 h1.52
  text "Material" at 132.014,64.217 h1.52
  text "Thickness" at 153.852,64.217 h1.52
  text "Constant" at 170.358,64.217 h1.52
  text "Board Layer Stack" at 184.832,64.217 h1.52
  text "Top Overlay" at 108.398,61.169 h1.52
  text "Top Solder" at 108.398,58.121 h1.52
  text "Solder Resist" at 132.014,58.121 h1.52
  text "3.00mil" at 153.852,58.121 h1.52
  text "3.5" at 170.358,58.121 h1.52
  text "1" at 97.987,55.073 h1.52
  text "Top Layer" at 108.398,55.073 h1.52
  text "10.00mil" at 153.852,55.073 h1.52
  text "Dielectric 1" at 108.398,52.025 h1.52
  text "FR-4" at 132.014,52.025 h1.52
  text "37.00mil" at 153.852,52.025 h1.52
  text "4.8" at 170.358,52.025 h1.52
  text "2" at 97.987,48.977 h1.52
  text "Bottom Layer" at 108.398,48.977 h1.52
  text "10.00mil" at 153.852,48.977 h1.52
  text "Bottom Solder" at 108.398,45.929 h1.52
  text "Solder Resist" at 132.014,45.929 h1.52
  text "3.00mil" at 153.852,45.929 h1.52
  text "3.5" at 170.358,45.929 h1.52
  text "Bottom Overlay" at 108.398,42.881 h1.52
Drill Drawing:
  circle w0.254: c-2.092,113.418 r0.508
  circle w0.254: c-2.092,113.418 r0.847
  lines w0.254: -2.939,85.901 -2.092,86.325 -1.246,85.901 -1.669,86.748 -1.246,87.595 -2.092,87.171 -2.939,87.595 -2.516,86.748 -2.939,85.901 ; -2.939,90.135 -2.516,90.135 -2.092,89.711 -1.669,90.135 -1.246,90.135 -1.669,90.558 -1.246,90.981 -1.669,90.981 -2.092,91.405 -2.516,90.981 -2.939,90.981 -2.516,90.558 -2.939,90.135 ; -2.939,93.521 -1.246,93.521 -1.246,95.215 -2.939,95.215 -2.939,93.521 ; -2.939,98.178 -2.092,97.331 -1.246,98.178 -2.092,99.025 -2.939,98.178 ; -2.939,101.565 -2.516,101.565 -2.516,101.141 -1.669,101.141 -1.669,101.565 -1.246,101.565 -1.246,102.411 -1.669,102.411 -1.669,102.835 -2.516,102.835 -2.516,102.411 -2.939,102.411 -2.939,101.565 ; -2.939,106.645 -1.246,106.645 -2.092,104.951 -2.939,106.645 ; -2.939,108.761 -2.939,109.185 -2.516,109.608 -2.939,110.031 -2.939,110.455 -2.516,110.455 -2.092,110.031 -1.669,110.455 -1.246,110.455 -1.246,110.031 -1.669,109.608 -1.246,109.185 -1.246,108.761 -1.669,108.761 -2.092,109.185 -2.516,108.761 -2.939,108.761 ; -2.939,118.075 -1.246,118.075 -2.092,116.381 -2.939,118.075 ; -2.939,120.615 -2.516,120.615 -2.092,120.191 -1.669,120.615 -1.246,120.615 -1.669,121.038 -1.246,121.461 -1.669,121.461 -2.092,121.885 -2.516,121.461 -2.939,121.461 -2.516,121.038 -2.939,120.615 ; -2.6,93.86 -1.584,93.86 -1.584,94.876 -2.6,94.876 -2.6,93.86 ; -2.6,117.736 -1.584,117.736 -2.092,116.72 -2.6,117.736 ; -2.6,120.784 -2.346,120.784 -2.092,120.53 -1.838,120.784 -1.584,120.784 -1.838,121.038 -1.584,121.292 -1.838,121.292 -2.092,121.546 -2.346,121.292 -2.6,121.292 -2.346,121.038 -2.6,120.784
  lines w0.381: -4.458,84.758 337.889,84.758 ; -4.458,122.858 337.889,122.858 ; 9.535,80.948 9.535,126.668 ; 24.771,80.948 24.771,126.668 ; 52.702,80.948 52.702,126.668 ; 65.552,80.948 65.552,126.668 ; 84.19,80.948 84.19,126.668 ; 122.279,80.948 122.279,126.668 ; 137.261,80.948 137.261,126.668 ; 156.204,80.948 156.204,126.668 ; 185.152,80.948 185.152,126.668 ; 206.837,80.948 206.837,126.668 ; 240.711,80.948 240.711,126.668 ; 274.585,80.948 274.585,126.668 ; 302.263,80.948 302.263,126.668 ; -4.458,80.948 337.889,80.948 337.889,126.668 -4.458,126.668 -4.458,80.948
  text "Symbol" at -2.172,124.001 h1.83
  text "Count" at 10.678,124.001 h1.83
  text "Hole Size" at 25.914,124.001 h1.83
  text "Plated" at 53.845,124.001 h1.83
  text "Hole Type" at 66.695,124.001 h1.83
  text "Drill Layer Pair" at 85.333,124.001 h1.83
  text "Via/Pad" at 123.422,124.001 h1.83
  text "Pad Shape" at 138.404,124.001 h1.83
  text "Template" at 157.347,124.001 h1.83
  text "Description" at 186.295,124.001 h1.83
  text "Hole Tolerance (+)" at 207.98,124.001 h1.83
  text "Hole Tolerance (-)" at 241.854,124.001 h1.83
  text "Hole Length" at 275.728,124.001 h1.83
  text "Routed Path Length" at 303.406,124.001 h1.83
  text "2" at 10.678,120.191 h1.52
  text "23.62mil (0.600mm)" at 25.914,120.191 h1.52
  text "PTH" at 53.845,120.191 h1.52
  text "Slot" at 66.695,120.191 h1.52
  text "Top Layer - Bottom Layer" at 85.333,120.191 h1.52
  text "Pad" at 123.422,120.191 h1.52
  text "Rounded" at 138.404,120.191 h1.52
  text "r90_170h60_140r100" at 157.347,120.191 h1.52
  text "55.12mil (1.400mm)" at 275.728,120.191 h1.52
  text "31.50mil (0.800mm)" at 303.406,120.191 h1.52
  text "2" at 10.678,116.381 h1.52
  text "23.62mil (0.600mm)" at 25.914,116.381 h1.52
  text "PTH" at 53.845,116.381 h1.52
  text "Slot" at 66.695,116.381 h1.52
  text "Top Layer - Bottom Layer" at 85.333,116.381 h1.52
  text "Pad" at 123.422,116.381 h1.52
  text "Rounded" at 138.404,116.381 h1.52
  text "(Mixed)" at 157.347,116.381 h1.52
  text "66.93mil (1.700mm)" at 275.728,116.381 h1.52
  text "43.31mil (1.100mm)" at 303.406,116.381 h1.52
  text "2" at 10.678,112.571 h1.52
  text "24.41mil (0.620mm)" at 25.914,112.571 h1.52
  text "NPTH" at 53.845,112.571 h1.52
  text "Round" at 66.695,112.571 h1.52
  text "Top Layer - Bottom Layer" at 85.333,112.571 h1.52
  text "Pad" at 123.422,112.571 h1.52
  text "Rounded" at 138.404,112.571 h1.52
  text "c0hn62" at 157.347,112.571 h1.52
  text "-" at 275.728,112.571 h1.52
  text "-" at 303.406,112.571 h1.52
  text "2" at 10.678,108.761 h1.52
  text "31.50mil (0.800mm)" at 25.914,108.761 h1.52
  text "NPTH" at 53.845,108.761 h1.52
  text "Round" at 66.695,108.761 h1.52
  text "Top Layer - Bottom Layer" at 85.333,108.761 h1.52
  text "Pad" at 123.422,108.761 h1.52
  text "Rounded" at 138.404,108.761 h1.52
  text "c0hn80" at 157.347,108.761 h1.52
  text "-" at 275.728,108.761 h1.52
  text "-" at 303.406,108.761 h1.52
  text "2" at 10.678,104.951 h1.52
  text "39.37mil (1.000mm)" at 25.914,104.951 h1.52
  text "PTH" at 53.845,104.951 h1.52
  text "Round" at 66.695,104.951 h1.52
  text "Top Layer - Bottom Layer" at 85.333,104.951 h1.52
  text "Pad" at 123.422,104.951 h1.52
  text "(Mixed)" at 138.404,104.951 h1.52
  text "(Mixed)" at 157.347,104.951 h1.52
  text "-" at 275.728,104.951 h1.52
  text "-" at 303.406,104.951 h1.52
  text "3" at 10.678,101.141 h1.52
  text "31.50mil (0.800mm)" at 25.914,101.141 h1.52
  text "PTH" at 53.845,101.141 h1.52
  text "Round" at 66.695,101.141 h1.52
  text "Top Layer - Bottom Layer" at 85.333,101.141 h1.52
  text "Pad" at 123.422,101.141 h1.52
  text "Rounded" at 138.404,101.141 h1.52
  text "c0h80" at 157.347,101.141 h1.52
  text "-" at 275.728,101.141 h1.52
  text "-" at 303.406,101.141 h1.52
  text "4" at 10.678,97.331 h1.52
  text "35.43mil (0.900mm)" at 25.914,97.331 h1.52
  text "PTH" at 53.845,97.331 h1.52
  text "Round" at 66.695,97.331 h1.52
  text "Top Layer - Bottom Layer" at 85.333,97.331 h1.52
  text "Pad" at 123.422,97.331 h1.52
  text "(Mixed)" at 138.404,97.331 h1.52
  text "(Mixed)" at 157.347,97.331 h1.52
  text "-" at 275.728,97.331 h1.52
  text "-" at 303.406,97.331 h1.52
  text "4" at 10.678,93.521 h1.52
  text "78.74mil (2.000mm)" at 25.914,93.521 h1.52
  text "PTH" at 53.845,93.521 h1.52
  text "Round" at 66.695,93.521 h1.52
  text "Top Layer - Bottom Layer" at 85.333,93.521 h1.52
  text "Pad" at 123.422,93.521 h1.52
  text "Rounded" at 138.404,93.521 h1.52
  text "c300h200" at 157.347,93.521 h1.52
  text "-" at 275.728,93.521 h1.52
  text "-" at 303.406,93.521 h1.52
  text "5" at 10.678,89.711 h1.52
  text "62.99mil (1.600mm)" at 25.914,89.711 h1.52
  text "PTH" at 53.845,89.711 h1.52
  text "Round" at 66.695,89.711 h1.52
  text "Top Layer - Bottom Layer" at 85.333,89.711 h1.52
  text "Pad" at 123.422,89.711 h1.52
  text "Rounded" at 138.404,89.711 h1.52
  text "c280h160" at 157.347,89.711 h1.52
  text "-" at 275.728,89.711 h1.52
  text "-" at 303.406,89.711 h1.52
  text "348" at 10.678,85.901 h1.52
  text "11.81mil (0.300mm)" at 25.914,85.901 h1.52
  text "PTH" at 53.845,85.901 h1.52
  text "Round" at 66.695,85.901 h1.52
  text "Top Layer - Bottom Layer" at 85.333,85.901 h1.52
  text "(Mixed)" at 123.422,85.901 h1.52
  text "Rounded" at 138.404,85.901 h1.52
  text "(Mixed)" at 157.347,85.901 h1.52
  text "-" at 275.728,85.901 h1.52
  text "-" at 303.406,85.901 h1.52
  text "374 Total" at 10.678,82.091 h1.52
  text "Slot definitions :" at -2.172,78.409 h1.52
  text "Routed Path Length" at 24.059,78.409 h1.52
  text "= Calculated from tool start centre position to tool end centre position." at 52.066,78.409 h1.52
  text "Hole Length" at 24.059,75.87 h1.52
  text "= Routed Path Length + Tool Size = Slot length as defined in the PCB layout" at 41.656,75.87 h1.52

## Dimensions
88.087,-1.956 to -1.676,-1.803 on Dimension
-1.676,-1.803 to -1.676,66.335 on Dimension

## Text inside footprints (layer, text, board x,y; h text height)
J2: Top Overlay "Board Edge" at 86.577,4.618 h0.71 r90
SW8: Top Overlay "Board Edge" at 53.353,0.036 h0.76 r180